# Altium PCB PCB_Interface_Board_7500-0428.PcbDoc (part 3 of 5)
Units mil, origin at the board's own origin, x right, y up, seen from the top; angles counter-clockwise.
Board outline 3850 x 4150 mil, 4 copper layers (Top Layer 1, GND+Signal, PWR+Signal, Bottom Layer 1), stack 62.449 mil thick; 247 components, 137 nets, 1675 pads, 241 vias.
Unrouted connection lines stored in the file: 122.
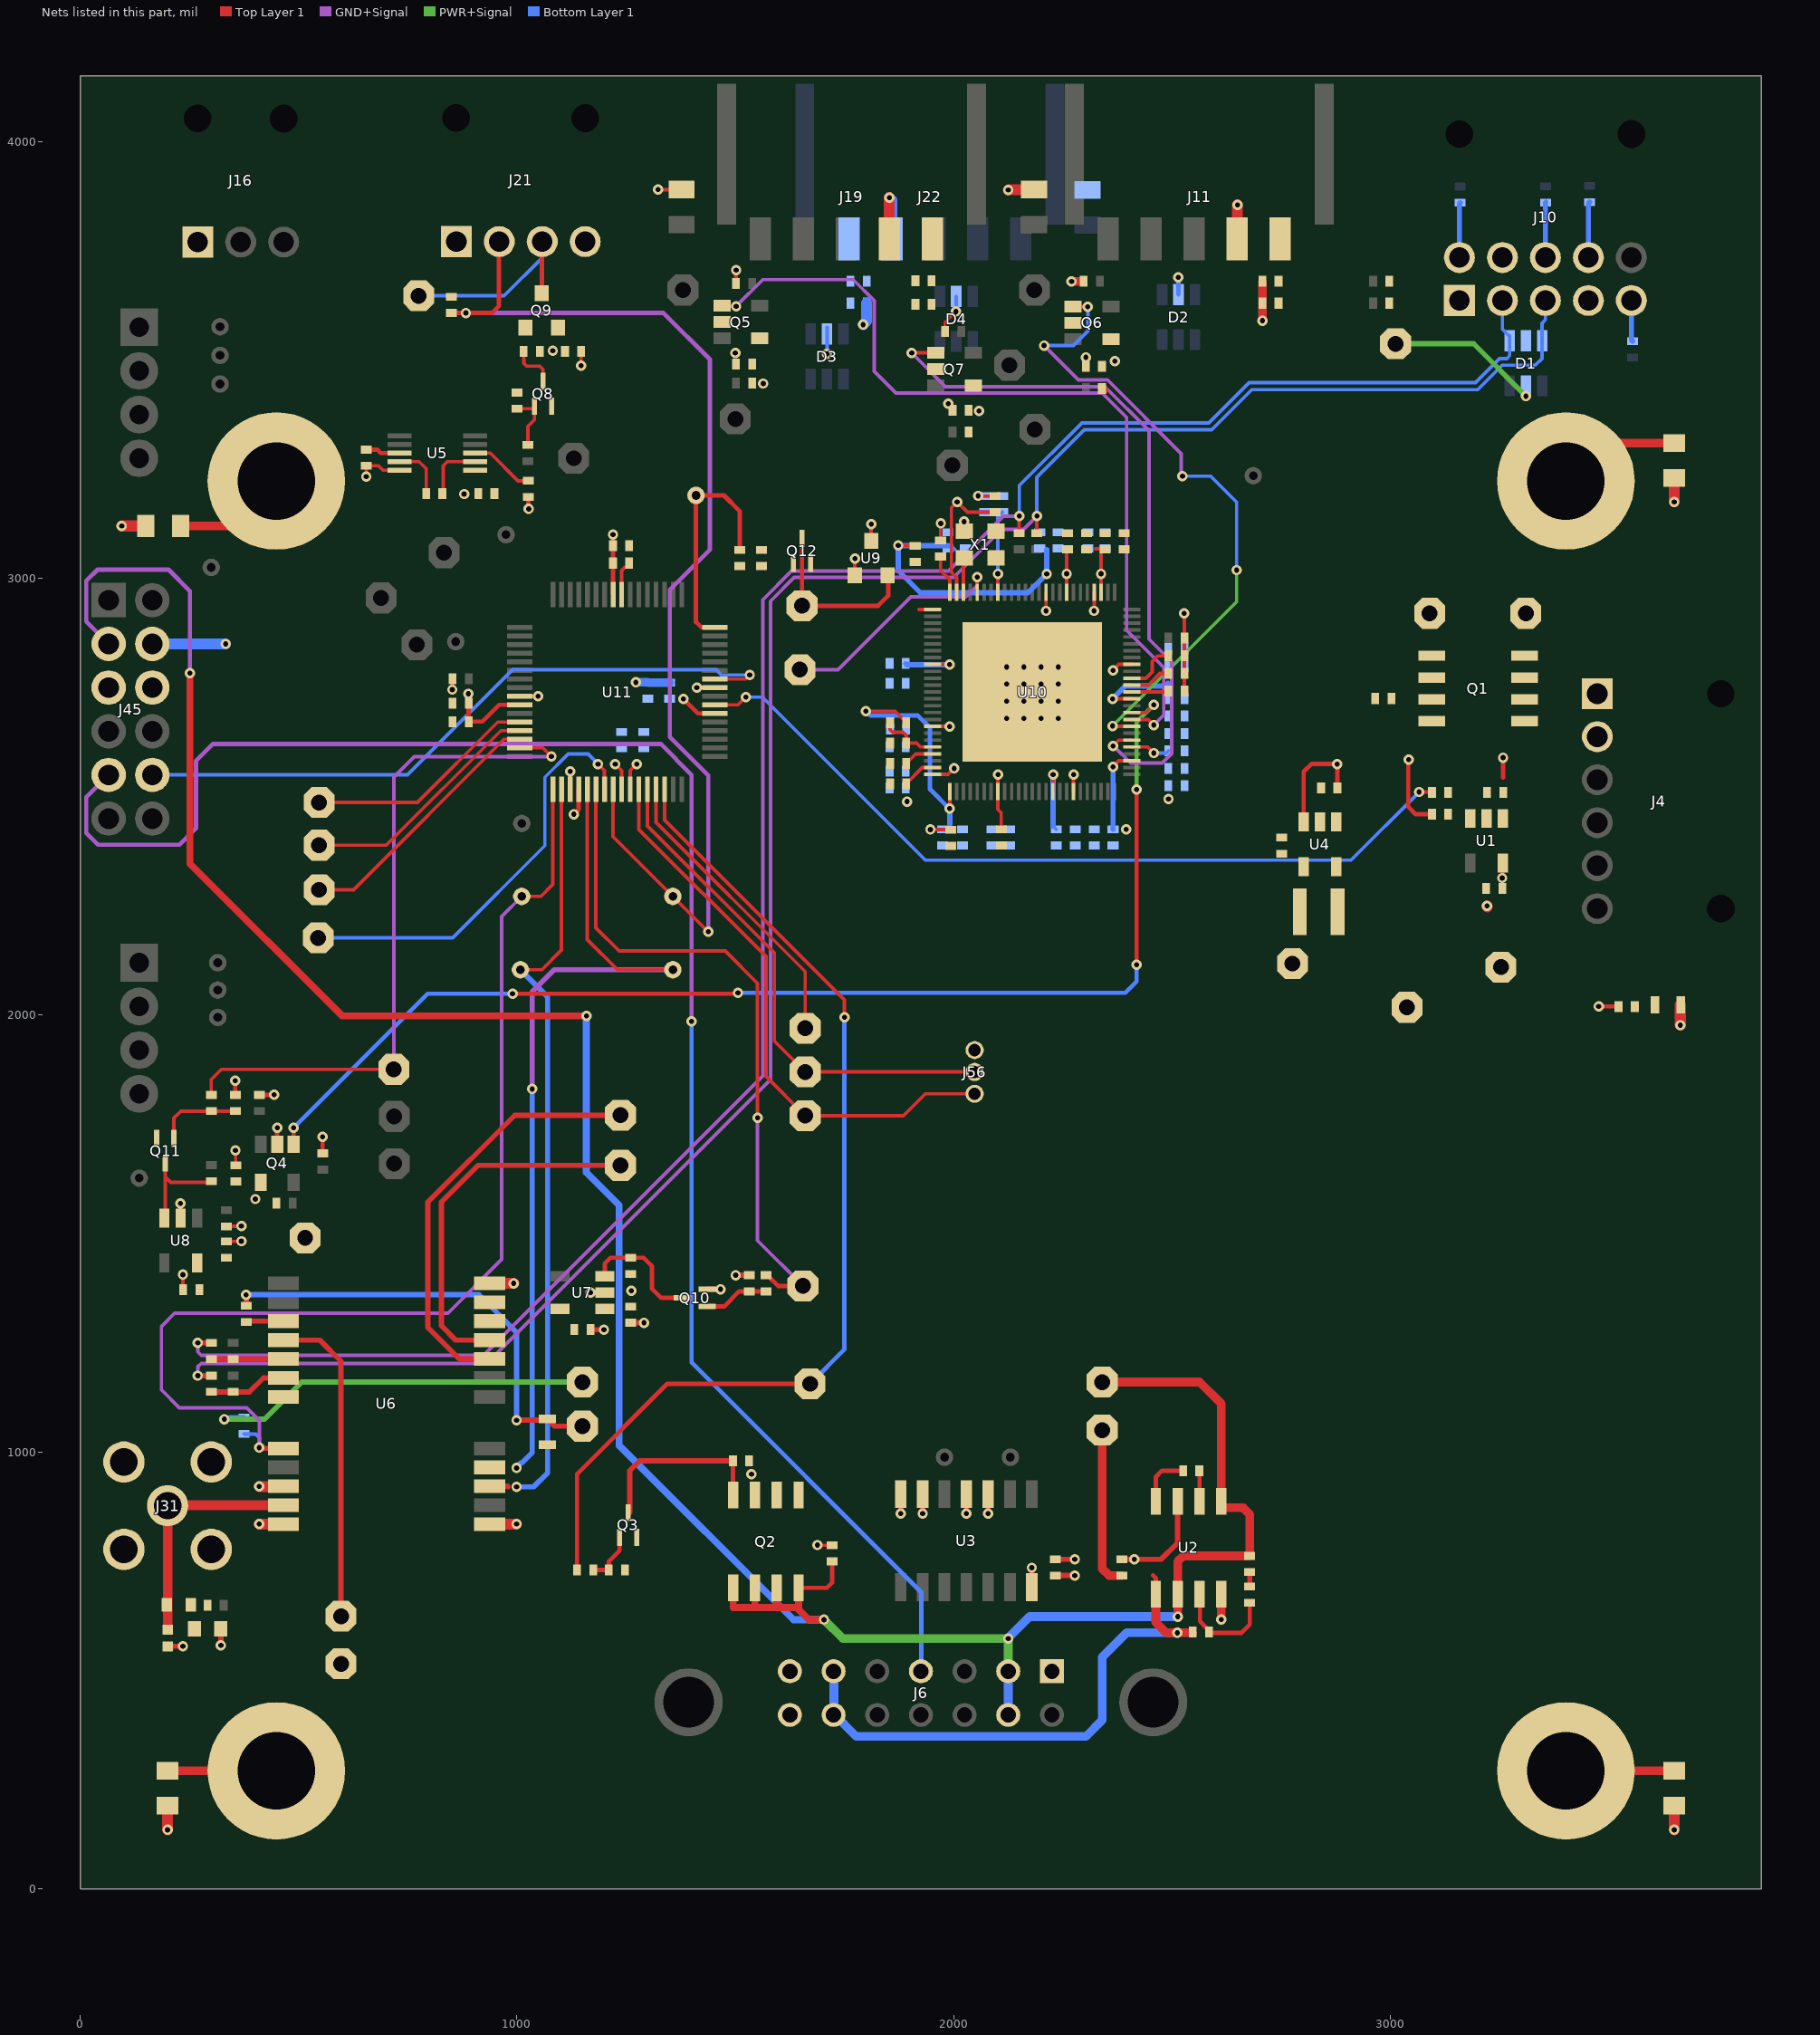
[diagram p4: the nets of this part, all layers, seen from the top]

## Part data (continued)
R44: library part RC0402FR-0712KL, "RES 12K OHM 1% 1/16W 0402", Case Code (Imperial)=0402, Case Code (Metric)=1005, Manufacturer=Yageo, Max Operating Temperature=155°C, Max Power Dissipation=63mW, Min Operating Temperature=-55°C, Package Quantity=1, Power Rating=62.5mW, Resistance Tolerance=1%, Resistor Type="Thick Film", Supplier Part Number=5655139, Temperature Coefficient=100ppm/°C, Voltage Rating=50V, Case/Package=0402, Category="Chip SMD Resistors", ComponentLink1Description=https://datasheet.ciiva.com/46412/1018594-46412831.pdf?src-supplier=Element14, ComponentLink1URL=https://datasheet.ciiva.com/46412/1018594-46412831.pdf?src-supplier=Element14, ComponentLink2Description=https://datasheet.ciiva.com/2453/pyu-r-int-thick-7-2453380.pdf?src-supplier=Digikey, ComponentLink2URL=https://datasheet.ciiva.com/2453/pyu-r-int-thick-7-2453380.pdf?src-supplier=Digikey, ComponentLink3Description=https://datasheet.ciiva.com/2453/pyu-r-int-thick-7-2453381.pdf?src-supplier=Digikey, ComponentLink3URL=https://datasheet.ciiva.com/2453/pyu-r-int-thick-7-2453381.pdf?src-supplier=Digikey, ComponentLink4Description=https://datasheet.ciiva.com/2453/pyu-r-int-thick-7-2453379.pdf?src-supplier=Digikey, ComponentLink4URL=https://datasheet.ciiva.com/2453/pyu-r-int-thick-7-2453379.pdf?src-supplier=Digikey, ComponentLink5Description=https://datasheet.ciiva.com/12577/pyu-rc0402-51-rohs-l-6-r-12577269.pdf?src-supplier=Mouser, ComponentLink5URL=https://datasheet.ciiva.com/12577/pyu-rc0402-51-rohs-l-6-r-12577269.pdf?src-supplier=Mouser, ComponentLink6Description=https://datasheet.ciiva.com/7849/1018594-7849833.pdf?src-supplier=Element14, ComponentLink6URL=https://datasheet.ciiva.com/7849/1018594-7849833.pdf?src-supplier=Element14, ComponentLink7Description=https://datasheet.ciiva.com/7849/1018594-7849832.pdf?src-supplier=Element14, ComponentLink7URL=https://datasheet.ciiva.com/7849/1018594-7849832.pdf?src-supplier=Element14, ComponentLink8Description=https://datasheet.ciiva.com/16744/pyu-rc0402-51-rohs-l-6-r-16744492.pdf?src-supplier=Future+Electronics, ComponentLink8URL=https://datasheet.ciiva.com/16744/pyu-rc0402-51-rohs-l-6-r-16744492.pdf?src-supplier=Future+Electronics, Construction=Rectangular, Depth=0.5mm, Features="Moisture Resistant", Height=0.016inch, Lead Free=5697LeadFree, Length=1mm, Manufacturer Part Number=RC0402FR-0712KL, Military Standard=Not, Number of Terminations=2, Packaging="Tape and Reel", Pricing="10000=0.0011, 100000=0.0011, 300000=0.001, 750000=0.001, 2000000=0.0009 (USD)", Reach SVHC Compliant=No, RoHS=Yes, RoHS Compliant=Yes, Series=RC, Stock=2030000, Supplier="Future Electronics", Termination=SMD/SMT, Tolerance=1%, Voltage Rating (AC)=50V, Weight=2.3E-05oz, Width=0.02inch
R54: library part RC0402JR-07200KL, "Res Thick Film 0402 200K Ohm 5% 1/16W", Case Code (Imperial)=0402, Case Code (Metric)=1005, LCSC Part Number=C137903, Manufacturer=Yageo, Max Operating Temperature=155°C, Max Power Dissipation=63mW, Min Operating Temperature=-55°C, Package Quantity=1, Power Rating=62.5mW, Resistance=200kR, Resistance Tolerance=5%, Resistor Type="Thick Film", Supplier Part Number 1=311-200KJRCT-ND, Temperature Coefficient=100ppm/°C, Voltage Rating=50V, Case/Package=0402, Category="Chip SMD Resistors", ComponentLink1Description=https://datasheet.ciiva.com/2452/pyu-r-int-thick-7-2452740.pdf?src-supplier=Digi-Key, ComponentLink1URL=https://datasheet.ciiva.com/2452/pyu-r-int-thick-7-2452740.pdf?src-supplier=Digi-Key, ComponentLink2Description=https://datasheet.ciiva.com/2452/pyu-r-int-thick-7-2452741.pdf?src-supplier=Digi-Key, ComponentLink2URL=https://datasheet.ciiva.com/2452/pyu-r-int-thick-7-2452741.pdf?src-supplier=Digi-Key, ComponentLink3Description=https://datasheet.ciiva.com/8886/pyu-rc0402-51-rohs-l-6-8886901.pdf?src-supplier=Avnet, ComponentLink3URL=https://datasheet.ciiva.com/8886/pyu-rc0402-51-rohs-l-6-8886901.pdf?src-supplier=Avnet, ComponentLink4Description=https://datasheet.ciiva.com/28393/pyu-rc0402-51-rohs-l-6-28393445.pdf?src-supplier=Avnet+Europe, ComponentLink4URL=https://datasheet.ciiva.com/28393/pyu-rc0402-51-rohs-l-6-28393445.pdf?src-supplier=Avnet+Europe, ComponentLink5Description=https://datasheet.ciiva.com/2452/pyu-r-int-thick-7-2452742.pdf?src-supplier=Digi-Key, ComponentLink5URL=https://datasheet.ciiva.com/2452/pyu-r-int-thick-7-2452742.pdf?src-supplier=Digi-Key, ComponentLink6Description=https://datasheet.ciiva.com/12577/pyu-rc0402-51-rohs-l-6-r-12577561.pdf?src-supplier=Mouser, ComponentLink6URL=https://datasheet.ciiva.com/12577/pyu-rc0402-51-rohs-l-6-r-12577561.pdf?src-supplier=Mouser, ComponentLink7Description=https://datasheet.ciiva.com/7983/1018594-7983562.pdf?src-supplier=Element14, ComponentLink7URL=https://datasheet.ciiva.com/7983/1018594-7983562.pdf?src-supplier=Element14, ComponentLink8Description=https://datasheet.ciiva.com/17485/pyu-rc0402-51-rohs-l-6-r-17485631.pdf?src-supplier=Future+Electronics, ComponentLink8URL=https://datasheet.ciiva.com/17485/pyu-rc0402-51-rohs-l-6-r-17485631.pdf?src-supplier=Future+Electronics, Construction=Rectangular, Contact Plating=Tin,Matte, Depth=0.5mm, Features="Moisture Resistant", Height=0.016inch, Lead Free="Lead Free", Length=1mm, Manufacturer Part Number=RC0402JR-07200KL, Military Standard=Not, Number of Terminations=2, Packaging="Tape and Reel", Pricing 1="1=0.10000, 10=0.01300, 100=0.00540, 1000=0.00244, 2500=0.00212, 5000=0.00175 (USD)", Radiation Hardening=No, REACH SVHC="No SVHC", RoHS=Yes, RoHS Compliant=Yes, Series=RC, Size Code=0402, Stock 1=182081, Supplier 1=Digi-Key, Termination=SMD/SMT, Tolerance=5%, Voltage Rating (DC)=50V, Weight=2.3E-05oz, Width=0.02inch
R58 R59 R60 R61: library part RC0805FR-070RL, "RES 0 OHM JUMPER 1/8W 0805", Case Code (Imperial)=0805, Case Code (Metric)=2012, LCSC Part Number=C100045, Manufacturer=Yageo, Max Operating Temperature=155°C, Max Power Dissipation=125mW, Min Operating Temperature=-55°C, Resistance=0mR, Resistor Type="Thick Film", Tolerance=1%, Case/Package=0805, Category="Chip SMD Resistors", ComponentLink1Description=https://datasheet.ciiva.com/15189/getdatasheetpartid-348154-15189885.pdf?src-supplier=Verical, ComponentLink1URL=https://datasheet.ciiva.com/15189/getdatasheetpartid-348154-15189885.pdf?src-supplier=Verical, ComponentLink2Description=https://datasheet.ciiva.com/17042/rc0805-17042698.pdf?src-supplier=Future+Electronics, ComponentLink2URL=https://datasheet.ciiva.com/17042/rc0805-17042698.pdf?src-supplier=Future+Electronics, Construction=Rectangular, Contact Plating=Tin,Matte, Depth=1.25mm, Features="Moisture Resistant", Item Type=Resistor, Lead Free="Lead Free", Length=2mm, Manufacturer Part Number=RC0805FR-070RL, Military Standard=Not, Number of Terminations=2, Packaging="Tape and Reel", Power Rating=125mW, Pricing 1="5000=0.00281, 10000=0.00277, 20000=0.00269 (USD)", Radiation Hardening=No, RoHS=Yes, RoHS Compliant=Yes, Series=RC, Size Code=0805, Stock 1=85000, Supplier 1=Avnet, Supplier Part Number 1=RC0805FR-070RL
U1 U7 U8: "LDO Regulator Pos 3.3V 0.25A 5-Pin SOT-23 T/R", Case/Package=SOT-23-5, Dropout Voltage=250mV, JLCPCB Part Number=C80670, Manufacturer="Texas Instruments", Max Operating Temperature=125°C, Max Output current=250mA, Max Supply Current=425uA, Max Supply Voltage=5.5V, Min Input Voltage=2.2V, Min Operating Temperature=-40°C, Nominal Output Voltage=3.3V, Nominal Supply Current=12uA, Package Quantity=3000, Power Supply Rejection Ratio (PSRR)=60dB, Quiescent Current=25uA, Supplier Part Number=296-38557-1-ND, Accuracy=2%, Category="Voltage Regulators - Linear", ComponentLink1Description=https://datasheet.ciiva.com/48475/lp5907-48475084.pdf?src-supplier=Avnet, ComponentLink1URL=https://datasheet.ciiva.com/48475/lp5907-48475084.pdf?src-supplier=Avnet, ComponentLink2Description=JLCPCB, ComponentLink2URL=https://jlcpcb.com/partdetail/TexasInstruments-LP5907MFX_3_3NOPB/C80670, Height=1.45mm, Item Type=IC, Lead Free="Lead Free", Length=2.9mm, Manufacturer Part Number=LP5907MFX-3.3/NOPB, Min Supply Voltage=2.2V, Mounting Technology="Surface Mount", Number of Channels=1NUMBER, Number of Outputs=1, Number of Regulators=1, Output Configuration=Positive, Output Current=250mA, Output Type=Fixed, Output Voltage=3.3V, Package=SOT-23-5, Packaging="Tape and Reel", Pins=5, Polarity=Positive, Pricing="1=0.6, 10=0.512, 25=0.478, 100=0.3823, 250=0.35496, 500=0.30034, 1000=0.23209 (USD)", Radiation Hardening=No, Reach SVHC Compliant=No, RoHS=Yes, RoHS Compliant=Yes, Series=-, Stock=22318, Supplier=Digikey, Thickness=1.2mm, Width=1.6mm
U2: "IC REG CHRG PUMP ADJ 200MA 8SOIC", Manufacturer=Maxim, Supplier Part Number=700-MAX889RESA, ComponentLink1Description=https://datasheet.ciiva.com/30477/0900766b81253d0c-30477617.pdf?src-supplier=Rs, ComponentLink1URL=https://datasheet.ciiva.com/30477/0900766b81253d0c-30477617.pdf?src-supplier=Rs, ComponentLink2Description=https://datasheet.ciiva.com/3215/max889-3215733.pdf?src-supplier=Avnet, ComponentLink2URL=https://datasheet.ciiva.com/3215/max889-3215733.pdf?src-supplier=Avnet, ComponentLink3Description=https://datasheet.ciiva.com/4874/max889-4874923.pdf?src-supplier=Mouser, ComponentLink3URL=https://datasheet.ciiva.com/4874/max889-4874923.pdf?src-supplier=Mouser, ComponentLink4Description=https://datasheet.ciiva.com/2028/max889-2028980.pdf?src-supplier=Digikey, ComponentLink4URL=https://datasheet.ciiva.com/2028/max889-2028980.pdf?src-supplier=Digikey, Item Type=IC, Manufacturer Part Number=MAX889RESA+, Pricing="1=6.21, 10=5.28, 50=5.28, 100=4.56, 1000=3.28, 10000=3.11 (USD)", RoHS=Yes, Stock=621, Supplier=Mouser
U3: "MAX3080 Series 115 kbps 5.25 V Full Duplex RS-485/RS-422 Transceiver - SOIC-14", Case/Package=SOIC, Manufacturer=Maxim, Max Operating Temperature=85°C, Max Power Dissipation=800mW, Min Operating Temperature=-40°C, Operating Supply Voltage=5V, Output Current=1uA, Output Voltage=13V, Package=14-SOIC, Package Quantity=2500, Supplier Part Number=MAX3080EESD+TCT-ND, Supply Current=375uA, Category="RS-232 / RS-422 / RS-485 Interface ICs", ComponentLink1Description=https://datasheet.ciiva.com/12260/max3080e-max3089e-99170-12260438.pdf?src-supplier=Mouser, ComponentLink1URL=https://datasheet.ciiva.com/12260/max3080e-max3089e-99170-12260438.pdf?src-supplier=Mouser, ComponentLink2Description=https://datasheet.ciiva.com/14430/max3080e-max3089e-14430038.pdf?src-supplier=Avnet, ComponentLink2URL=https://datasheet.ciiva.com/14430/max3080e-max3089e-14430038.pdf?src-supplier=Avnet, ComponentLink3Description=https://datasheet.ciiva.com/1774/max3080e-max3089e-1774749.pdf?src-supplier=Digikey, ComponentLink3URL=https://datasheet.ciiva.com/1774/max3080e-max3089e-1774749.pdf?src-supplier=Digikey, Data Rate=115Kbps, Item Type=IC, Lead Free="Lead Free", Logic Function=Transceiver, Manufacturer Part Number=MAX3080EESD+T, Mounting Technology="Surface Mount", Number of Drivers=1, Number of Receivers=1, Number of Transmitters=1, Packaging="Tape and Reel", Pricing="1=6.26, 10=5.625, 25=5.3176, 100=4.6086, 250=4.37228, 500=3.92324, 1000=3.30876 (USD)", RoHS=Yes, RoHS Compliant=Yes, Series=MAX3080E, Stock=1816, Supplier=Digikey
U4: "IC REG BUCK 1.2V 600MA SOT23-5", Case/Package=SOT-23-5, LCSC Part Number=C2071166, Manufacturer="TI National Semiconductor", Max Operating Temperature=85°C, Max Output current=600mA, Max Supply Voltage=5.5V, Min Input Voltage=2.7V, Min Operating Temperature=-30°C, Min Output Voltage=1.2V, Package Quantity=3000, Quiescent Current=300uA, Switching Frequency=2MHz, ComponentLink1Description=http://components.arrow.com/part/dataview/56701705S8560073N1317?src-supplier=Arrow+Electronics, ComponentLink1URL=http://components.arrow.com/part/dataview/56701705S8560073N1317?src-supplier=Arrow+Electronics, ComponentLink2Description=http://www.ti.com/general/docs/suppproductinfo.tsp?distId=10&amp;gotoUrl=http%3A%2F%2Fwww.ti.com%2Flit%2Fgpn%2Flm3674&src-supplier=Digikey, ComponentLink2URL=http://www.ti.com/general/docs/suppproductinfo.tsp?distId=10&amp;gotoUrl=http%3A%2F%2Fwww.ti.com%2Flit%2Fgpn%2Flm3674&src-supplier=Digikey, ComponentLink3Description=http://www.ti.com/lit/gpn/lm3674?src-supplier=Mouser, ComponentLink3URL=http://www.ti.com/lit/gpn/lm3674?src-supplier=Mouser, ComponentLink4Description=http://www.ti.com/lit/ds/symlink/lm3674.pdf?src-supplier=Avnet, ComponentLink4URL=http://www.ti.com/lit/ds/symlink/lm3674.pdf?src-supplier=Avnet, ComponentLink5Description=http://www.ti.com/lit/ds/symlink/lm3674.pdf?src-supplier=Digikey, ComponentLink5URL=http://www.ti.com/lit/ds/symlink/lm3674.pdf?src-supplier=Digikey, Item Type=IC, Lead Free="Lead Free", Manufacturer Part Number=LM3674MFX-1.2/NOPB, Mounting Technology="Surface Mount", Number of Outputs=1, Operating Supply Voltage=5.5V, Output Configuration=Positive, Output Current=600mA, Output Type=Fixed, Output Voltage=1.2V, Packaging="Tape and Reel", Pins=5, Pricing="1=1.54, 10=1.38, 50=1.38, 100=1.07, 1000=0.702, 10000=0.599 (USD)", Radiation Hardening=No, RoHS=Yes, RoHS Compliant=Yes, Series=-, Stock=390, Supplier=Mouser, Synchronous Rectifier=Yes
U5: "IC TXRX RS232 460KBPS 10-UMAX", Case/Package=UMAX, JLCPCB Part Number=C1121855, Manufacturer=Maxim, Max Operating Temperature=85°C, Min Operating Temperature=-40°C, Package=MSOP-10, Supplier Part Number=MAX3311EEUB+TCT-ND, Category="RS-232 / RS-422 / RS-485 Interface ICs", ComponentLink1Description=https://datasheet.ciiva.com/14430/max3311e-max3313e-14430143.pdf?src-supplier=Avnet, ComponentLink1URL=https://datasheet.ciiva.com/14430/max3311e-max3313e-14430143.pdf?src-supplier=Avnet, ComponentLink2Description=https://datasheet.ciiva.com/1774/max3311e-max3313e-1774738.pdf?src-supplier=Digikey, ComponentLink2URL=https://datasheet.ciiva.com/1774/max3311e-max3313e-1774738.pdf?src-supplier=Digikey, ComponentLink3Description=JLCPCB, ComponentLink3URL=https://jlcpcb.com/partdetail/1212276-MAX3311EEUBT/C1121855, Data Rate=460Kbps, Item Type=IC, Lead Free="Lead Free", Manufacturer Part Number=MAX3311EEUB+T, Mounting Technology="Surface Mount", Packaging="Cut Tape", Pricing="1=5.92, 10=5.32, 25=5.0292, 100=4.3588, 250=4.13524, 500=3.71054, 1000=3.12937 (USD)", Receiver Hysteresis=500mV, RoHS=Yes, RoHS Compliant=Yes, Series=-, Simplex/Duplex="Full Duplex", Stock=3791, Supplier=Digikey
U6: "Rf Receiver Gnss/gps 1.575GHZ", Case/Package=SMD/SMT, Frequency=1.575GHz, Manufacturer=u-blox, Max Operating Temperature=105°C, Min Operating Temperature=-40°C, Supplier Part Number=672-1174-1-ND, Category="RF Receivers, Transceivers", ComponentLink1Description=https://www.u-blox.com/sites/default/files/NEO-M8Q-01A_DataSheet_%28UBX-15013820%29.pdf?src-supplier=Digikey, ComponentLink1URL=https://www.u-blox.com/sites/default/files/NEO-M8Q-01A_DataSheet_%28UBX-15013820%29.pdf?src-supplier=Digikey, Interface=I2C,SPI,USB,UART, Item Type=Module, Manufacturer Part Number=NEO-M8Q-01A, Mounting Technology="Surface Mount", Pricing="1=25, 10=20.244 (USD)", RoHS=Yes, RoHS Compliant=Yes, Sensitivity=-167dBm, Series=NEO-M8Q-01A, Stock=322, Supplier=Digikey
U9: "IC SUPERVISOR 1 CHANNEL SOT23-3", Case/Package=SOT-23-3, LCSC Part Number=C626154, Manufacturer=Microchip, Max Operating Temperature=125°C, Max Reset Threshold Voltage=3.05V, Max Supply Voltage=5.5V, Min Operating Temperature=-40°C, Min Supply Voltage=1V, Number of Voltages Monitored=1, Operating Supply Current=4.5uA, Supply Current=18uA, Threshold Voltage=2.93V, ComponentLink1Description=https://datasheet.ciiva.com/5838/1441861-5838549.pdf?src-supplier=Farnell, ComponentLink1URL=https://datasheet.ciiva.com/5838/1441861-5838549.pdf?src-supplier=Farnell, ComponentLink2Description=https://datasheet.ciiva.com/12957/mic803-12957068.pdf?src-supplier=Mouser, ComponentLink2URL=https://datasheet.ciiva.com/12957/mic803-12957068.pdf?src-supplier=Mouser, ComponentLink3Description=https://datasheet.ciiva.com/16462/mic803-16462056.pdf?src-supplier=Future+Electronics, ComponentLink3URL=https://datasheet.ciiva.com/16462/mic803-16462056.pdf?src-supplier=Future+Electronics, Item Type=IC, Manufacturer Part Number=MIC803-29D4VM3-TR, Mounting Technology="Surface Mount", Number of Elements=1, Packaging="Tape and Reel", Pins=3, Pricing="1=0.43, 25=0.35, 100=0.33 (USD)", Reach SVHC Compliant=No, Reset="Active Low", Reset Timeout=1.12s, RoHS=Yes, RoHS Compliant=Yes, Series=-, Stock=5352, Supplier=Digikey, Type="Simple Reset/Power-On Reset", Watchdog Timer=No
U10: "IC USB HUB CNTRLR 100VQFN", Case/Package=VQFN, Manufacturer=Microchip, Supplier Part Number=USB7002-I/KDX-ND, ComponentLink1Description=http://ww1.microchip.com/downloads/en/devicedoc/00002445a.pdf?src-supplier=Digikey, ComponentLink1URL=http://ww1.microchip.com/downloads/en/devicedoc/00002445a.pdf?src-supplier=Digikey, Interface=USB, Item Type=IC, Manufacturer Part Number=USB7002-I/KDX, Packaging=Tray, Pricing="1=10.9, 25=9.09, 100=8.775 (USD)", RoHS=Yes, RoHS Compliant=Yes, Series="Automotive, AEC-Q100", Stock=148, Supplier=Digikey
U11: "IC MCU 8BIT 96KB FLASH 64TQFP", Case/Package=TQFP, Clock Frequency=40MHz, Manufacturer=Microchip, Max Operating Temperature=125°C, Max Power Dissipation=1W, Max Supply Voltage=5.5V, Min Operating Temperature=-40°C, Min Supply Voltage=4.2V, Operating Supply Voltage=5V, Package Quantity=1200, Supplier Part Number=PIC18F6627T-E/PT-ND, Access Time=40us, ComponentLink1Description=https://datasheet.ciiva.com/1496/39646c-1496640.pdf?src-supplier=Avnet, ComponentLink1URL=https://datasheet.ciiva.com/1496/39646c-1496640.pdf?src-supplier=Avnet, ComponentLink2Description=https://datasheet.ciiva.com/6650/39646c-6650215.pdf?src-supplier=Digikey, ComponentLink2URL=https://datasheet.ciiva.com/6650/39646c-6650215.pdf?src-supplier=Digikey, Core Architecture=PIC, Data Bus Width=8b, Frequency=40MHz, Interface=I2C,SPI,UART,USART, Item Type=Microcontrollers, Lead Free="Lead Free", Manufacturer Part Number=PIC18F6627T-E/PT, Memory Format=FLASH, Memory Size=96KB, Mounting Technology="Surface Mount", Number of Programmable I/O=54, Number of Timers/Counters=5, Oscillator Type=Internal, Packaging="Tape and Reel", Peripherals="Brown-out Detect/Reset,POR,PWM,WDT,HLVD", Pins=64, Pricing="1200=9.8625 (USD)", Radiation Hardening=No, RAM Size=3936B, RoHS=Yes, RoHS Compliant=Yes, Series="PIC® 18F", Supplier=Digikey, Watchdog Timer=Yes
X1: library part ECS-2033-250-BN, "XTAL OSC XO 25.0000MHZ CMOS SMD", LCSC Part Number=C2441279, Manufacturer="ECS International", ComponentLink1Description=https://datasheet.ciiva.com/865/ecs-2025-2033-865424.pdf?src-supplier=Digikey, ComponentLink1URL=https://datasheet.ciiva.com/865/ecs-2025-2033-865424.pdf?src-supplier=Digikey, ComponentLink2Description=https://datasheet.ciiva.com/865/ecs-2025-2033-865425.pdf?src-supplier=Digikey, ComponentLink2URL=https://datasheet.ciiva.com/865/ecs-2025-2033-865425.pdf?src-supplier=Digikey, ComponentLink3Description=https://datasheet.ciiva.com/865/ecs-2025-2033-865426.pdf?src-supplier=Digikey, ComponentLink3URL=https://datasheet.ciiva.com/865/ecs-2025-2033-865426.pdf?src-supplier=Digikey, Item Type=Oscillators, Manufacturer Part Number=ECS-2033-250-BN, Pricing="1=2.82, 10=2.757, 50=2.626, 100=2.2978, 500=2.2321 (USD)", RoHS=Yes, Stock=33494, Supplier=Digikey

## Free pads (board coordinates)
  round 5 on Mech8: 1(0,4150) 1(3402,270) 1(3402,270) 1(3850,0)
  round 3 on Mech7: 1(10,1773) 1(10,1773) 1(10,2167) 1(10,2167) 1(10,3228) 1(10,3228) 1(10,3622) 1(10,3622) 1(13,2400) 1(13,2400) 1(13,3000) 1(13,3000) 1(163.5,1649.5) 1(163.5,1649.5) 1(163.5,1680.5) 1(163.5,1680.5) 1(168.5,634.25) 1(168.5,634.25) 1(168.5,665.75) 1(168.5,665.75) 1(170,1451) 1(170,1451) 1(170,1519) 1(170,1519) 1(170.31,3096.38) 1(170.31,3143.62) 1(176.38,210.31) 1(176.38,249.69) 1(202,3758) 1(202,3758) 1(202,4179) 1(202,4179) 1(209.69,3096.38) 1(209.69,3143.62) 1(213,2400) 1(213,2400) 1(213,3000) 1(213,3000) 1(219,1279) 1(219,1339) 1(223.62,210.31) 1(223.62,249.69) 1(224,3758) 1(226.5,1649.5) 1(226.5,1649.5) 1(226.5,1680.5) 1(226.5,1680.5) 1(228.5,564.25) 1(228.5,564.25) 1(228.5,595.75) 1(228.5,595.75) 1(231.5,634.25) 1(231.5,634.25) 1(231.5,665.75) 1(231.5,665.75) 1(260,1773) 1(260,1773) 1(260,2167) 1(260,2167) 1(260,3228) 1(260,3228) 1(260,3622) 1(260,3622) 1(282,1100) 1(290,1451) 1(290,1451) 1(290,1519) 1(290,1519) 1(291.5,564.25) 1(291.5,564.25) 1(291.5,595.75) 1(291.5,595.75) 1(310,1279) 1(310,1279) 1(316,3758) 1(318,1100) 1(318,1100) 1(324,3758) 1(325,1415.31) 1(325,1454.69) 1(325,1505.31) 1(325,1544.69) 1(333,1257) 1(336,1118) 1(340,1339) 1(340,1339) 1(345,1415.31) 1(345,1454.69) 1(345,1505.31) 1(345,1544.69) 1(345,1615.31) 1(345,1654.69) 1(358,1322) 1(365,1615.31) 1(365,1654.69) 1(390.94,1633.5) 1(390.94,1633.5) 1(390.94,1696.5) 1(390.94,1696.5) 1(413,3758) 1(422,3758) 1(509.06,1633.5) 1(509.06,1633.5) 1(509.06,1696.5) 1(509.06,1696.5) 1(511,3758) 1(535,1645.31) 1(535,1684.69) 1(535,3758) 1(535,3758) 1(535,4179) 1(535,4179) 1(555,1645.31) 1(555,1684.69) 1(645,3245.31) 1(645,3284.69) 1(665,3245.31) 1(665,3284.69) 1(760,3230) 1(760,3230) 1(760,3350) 1(760,3350) 1(792,3758) 1(792,3758) 1(792,4179) 1(792,4179) 1(800.31,3186) 1(800.31,3206) 1(814,3758) 1(815.31,2645) 1(815.31,2665) 1(818.5,2694.25) 1(818.5,2694.25) 1(818.5,2725.75) 1(818.5,2725.75) 1(839.69,3186) 1(839.69,3206) 1(854.69,2645) 1(854.69,2665) 1(880,3230) 1(880,3230) 1(880,3350) 1(880,3350) 1(881.5,2694.25) 1(881.5,2694.25) 1(881.5,2725.75) 1(881.5,2725.75) 1(906,3758) 1(909.31,3186) 1(909.31,3206) 1(914,3758) 1(948.69,3186) 1(948.69,3206) 1(1000,3592) 1(1000,3592) 1(1000,3648) 1(1000,3648) 1(1003,3758) 1(1012,3758) 1(1028.5,3394.5) 1(1028.5,3394.5) 1(1028.5,3425.5) 1(1028.5,3425.5) 1(1054,1028) 1(1054,1092) 1(1086,1028) 1(1086,1092) 1(1091.5,3394.5) 1(1091.5,3394.5) 1(1091.5,3425.5) 1(1091.5,3425.5) 1(1101,3758) 1(1110.31,3510) 1(1110.31,3530) 1(1111,3758) 1(1116,1305) 1(1116,1305) 1(1116,1425) 1(1116,1425) 1(1120,3592) 1(1120,3592) 1(1120,3648) 1(1120,3648) 1(1130.31,1260) 1(1130.31,1280) 1(1149.69,3510) 1(1149.69,3530) 1(1169.69,1260) 1(1169.69,1280) 1(1184,1305) 1(1184,1305) 1(1184,1425) 1(1184,1425) 1(1193,9) 1(1193,9) 1(1193,423) 1(1193,497) 1(1193,549) 1(1193,549) 1(1200,3758) 1(1223,3758) 1(1223,3758) 1(1223,4179) 1(1223,4179) 1(1223.5,824.5) 1(1223.5,824.5) 1(1223.5,855.5) 1(1223.5,855.5) 1(1228.5,3084.25) 1(1228.5,3084.25) 1(1228.5,3115.75) 1(1228.5,3115.75) 1(1250,1285.31) 1(1250,1324.69) 1(1250.31,3145) 1(1250.31,3165) 1(1270,1285.31) 1(1270,1324.69) 1(1286.5,824.5) 1(1286.5,824.5) 1(1286.5,855.5) 1(1286.5,855.5) 1(1289.69,3145) 1(1289.69,3165) 1(1291.5,3084.25) 1(1291.5,3084.25) 1(1291.5,3115.75) 1(1291.5,3115.75) 1(1384.25,3818.5) 1(1384.25,3818.5) 1(1384.25,3881.5) 1(1384.25,3881.5) 1(1394.5,1328.5) 1(1394.5,1328.5) 1(1394.5,1391.5) 1(1394.5,1391.5) 1(1415.75,3818.5) 1(1415.75,3818.5) 1(1415.75,3881.5) 1(1415.75,3881.5) 1(1425.5,1328.5) 1(1425.5,1328.5) 1(1425.5,1391.5) 1(1425.5,1391.5) 1(1449,3733) 1(1449,3733) 1(1449,4183) 1(1449,4183) 1(1472,712) 1(1472,712) 1(1472,868) 1(1472,868) 1(1483.5,3525.94) 1(1483.5,3525.94) 1(1483.5,3644.06) 1(1483.5,3644.06) 1(1495.31,3670) 1(1495.31,3690) 1(1517,4126) 1(1534.69,3670) 1(1534.69,3690) 1(1535.31,3470) 1(1535.31,3490) 1(1546.5,3525.94) 1(1546.5,3525.94) 1(1546.5,3644.06) 1(1546.5,3644.06) 1(1574.69,3470) 1(1574.69,3490) 1(1628.5,3034.5) 1(1628.5,3034.5) 1(1628.5,3065.5) 1(1628.5,3065.5) 1(1668,712) 1(1668,712) 1(1668,868) 1(1668,868) 1(1691.5,3034.5) 1(1691.5,3034.5) 1(1691.5,3065.5) 1(1691.5,3065.5) 1(1704.25,728.5) 1(1704.25,728.5) 1(1704.25,791.5) 1(1704.25,791.5) 1(1735.75,728.5) 1(1735.75,728.5) 1(1735.75,791.5) 1(1735.75,791.5) 1(1750,3022) 1(1750,3022) 1(1750,3078) 1(1750,3078) 1(1858,712) 1(1858,712) 1(1858,868) 1(1858,868) 1(1870,3022) 1(1870,3022) 1(1870,3078) 1(1870,3078) 1(1925.31,3570) 1(1925.31,3590) 1(1925.31,3620) 1(1925.31,3640) 1(1964.69,3570) 1(1964.69,3590) 1(1964.69,3620) 1(1964.69,3640) 1(1975,2396.31) 1(1975,2435.69) 1(1978.5,3420.94) 1(1978.5,3420.94) 1(1978.5,3539.06) 1(1978.5,3539.06) 1(1990.31,3375) 1(1990.31,3395) 1(1995,2396.31) 1(1995,2435.69) 1(2001,1780) 1(2001,1780) 1(2001,1960) 1(2001,1960) 1(2021,4126) 1(2029.69,3375) 1(2029.69,3395) 1(2041.5,3420.94) 1(2041.5,3420.94) 1(2041.5,3539.06) 1(2041.5,3539.06) 1(2060.31,3150) 1(2060.31,3170) 1(2088,3733) 1(2088,3733) 1(2088,4183) 1(2088,4183) 1(2090,2396.31) 1(2090,2435.69) 1(2095,1780) 1(2095,1780) 1(2095,1960) 1(2095,1960) 1(2099.69,3150) 1(2099.69,3170) 1(2110,2396.31) 1(2110,2435.69) 1(2184.25,3818.5) 1(2184.25,3818.5) 1(2184.25,3881.5) 1(2184.25,3881.5) 1(2194,3114) 1(2200,3120) 1(2200,3120) 1(2200,3150) 1(2202,712) 1(2202,712) 1(2202,868) 1(2202,868) 1(2215.75,3818.5) 1(2215.75,3818.5) 1(2215.75,3881.5) 1(2215.75,3881.5) 1(2235,725.31) 1(2235,764.69) 1(2249,3733) 1(2249,3733) 1(2249,4183) 1(2249,4183) 1(2250,3065.31) 1(2250,3104.69) 1(2255,725.31) 1(2255,764.69) 1(2270,3065.31) 1(2270,3104.69) 1(2283.5,3525.94) 1(2283.5,3525.94) 1(2283.5,3644.06) 1(2283.5,3644.06) 1(2290,3065.31) 1(2290,3104.69) 1(2295.31,3670) 1(2295.31,3690) 1(2310,3065.31) 1(2310,3104.69) 1(2317,4126) 1(2334.69,3670) 1(2334.69,3690) 1(2335,3085.31) 1(2335,3124.69) 1(2335.31,3475) 1(2335.31,3495) 1(2346.5,3525.94) 1(2346.5,3525.94) 1(2346.5,3644.06) 1(2346.5,3644.06) 1(2355,3085.31) 1(2355,3124.69) 1(2369.25,728.5) 1(2369.25,728.5) 1(2369.25,791.5) 1(2369.25,791.5) 1(2374.69,3475) 1(2374.69,3495) 1(2380,3085.31) 1(2380,3124.69) 1(2400,3085.31) 1(2400,3124.69) 1(2400.75,728.5) 1(2400.75,728.5) 1(2400.75,791.5) 1(2400.75,791.5) 1(2438,722) 1(2438,858) 1(2515.31,965) 1(2515.31,985) 1(2554.69,965) 1(2554.69,985) 1(2632,722) 1(2632,778) 1(2632,778) 1(2632,778) 1(2632,802) 1(2632,802) 1(2632,802) 1(2632,858) 1(2657,9) 1(2657,9) 1(2657,423) 1(2657,497) 1(2657,549) 1(2657,549) 1(2714.25,2348.5) 1(2714.25,2348.5) 1(2714.25,2411.5) 1(2714.25,2411.5) 1(2725.31,3620) 1(2725.31,3640) 1(2745.75,2348.5) 1(2745.75,2348.5) 1(2745.75,2411.5) 1(2745.75,2411.5) 1(2764.69,3620) 1(2764.69,3640) 1(2780,2366) 1(2780,2366) 1(2780,2434) 1(2780,2434) 1(2821,4126) 1(2840.31,2500) 1(2840.31,2520) 1(2879.69,2500) 1(2879.69,2520) 1(2888,3733) 1(2888,3733) 1(2888,4183) 1(2888,4183) 1(2900,2366) 1(2900,2366) 1(2900,2434) 1(2900,2434) 1(3092,3668) 1(3092,3668) 1(3092,4187) 1(3092,4187) 1(3114,3668) 1(3122,2652) 1(3122,2652) 1(3122,2848) 1(3122,2848) 1(3160,2366) 1(3160,2366) 1(3160,2434) 1(3160,2434) 1(3206,3668) 1(3214,3668) 1(3215.31,2280) 1(3215.31,2300) 1(3220.31,2500) 1(3220.31,2520) 1(3254.69,2280) 1(3254.69,2300) 1(3259.69,2500) 1(3259.69,2520) 1(3278,2652) 1(3278,2652) 1(3278,2848) 1(3278,2848) 1(3280,2366) 1(3280,2366) 1(3280,2434) 1(3280,2434) 1(3303,3668) 1(3312,3668) 1(3401,3668) 1(3411,3668) 1(3461,2175) 1(3461,2175) 1(3461,2198) 1(3461,2287) 1(3461,2297) 1(3461,2386) 1(3461,2395) 1(3461,2484) 1(3461,2494) 1(3461,2583) 1(3461,2592) 1(3461,2681) 1(3461,2689) 1(3461,2781) 1(3461,2803) 1(3461,2803) 1(3500,3668) 1(3509,3668) 1(3598,3668) 1(3621,3668) 1(3621,3668) 1(3621,4187) 1(3621,4187) 1(3626.38,210.31) 1(3626.38,249.69) 1(3626.38,3250.31) 1(3626.38,3289.69) 1(3673.62,210.31) 1(3673.62,249.69) 1(3673.62,3250.31) 1(3673.62,3289.69) 1(3882,2175) 1(3882,2175) 1(3882,2803) 1(3882,2803)
  round 3.94 on Mech7: 1(62.2,827.76) 1(62.2,922.24) 1(152.76,737.2) 1(152.76,1012.8) 1(247.24,737.2) 1(247.24,1012.8) 1(337.8,827.76) 1(337.8,922.24)
  round 2.5 on Mech7: 1(158,560) 1(158,600) 1(182,560) 1(182,600) 1(229.35,1360.98) 1(229.35,1383.02) 1(272.65,1360.98) 1(272.65,1383.02) 1(283.5,631.1) 1(283.5,668.9) 1(288.98,1128.35) 1(288.98,1171.65) 1(288.98,1208.35) 1(288.98,1251.65) 1(288.98,1608.35) 1(288.98,1651.65) 1(288.98,1783.35) 1(288.98,1826.65) 1(311.02,1128.35) 1(311.02,1171.65) 1(311.02,1208.35) 1(311.02,1251.65) 1(311.02,1608.35) 1(311.02,1651.65) 1(311.02,1783.35) 1(311.02,1826.65) 1(338.98,1128.35) 1(338.98,1171.65) 1(338.98,1208.35) 1(338.98,1251.65) 1(343.98,1783.35) 1(343.98,1826.65) 1(346.5,631.1) 1(346.5,668.9) 1(361.02,1128.35) 1(361.02,1171.65) 1(361.02,1208.35) 1(361.02,1251.65) 1(366.02,1783.35) 1(366.02,1826.65) 1(368.98,1288.35) 1(368.98,1331.65) 1(374.98,1038.35) 1(374.98,1081.65) 1(391.02,1288.35) 1(391.02,1331.65) 1(397.02,1038.35) 1(397.02,1081.65) 1(398.98,1783.35) 1(398.98,1826.65) 1(421.02,1783.35) 1(421.02,1826.65) 1(452.35,1558.98) 1(452.35,1581.02) 1(495.65,1558.98) 1(495.65,1581.02) 1(838.98,3598.35) 1(838.98,3641.65) 1(848.35,2758.98) 1(848.35,2781.02) 1(861.02,3598.35) 1(861.02,3641.65) 1(891.65,2758.98) 1(891.65,2781.02) 1(948.98,3388.35) 1(948.98,3431.65) 1(971.02,3388.35) 1(971.02,3431.65) 1(1013.98,3268.35) 1(1013.98,3311.65) 1(1014.98,3189.35) 1(1014.98,3232.65) 1(1018.35,3508.98) 1(1018.35,3531.02) 1(1030,2540) 1(1030,2540) 1(1030,2586) 1(1030,2894) 1(1030,2940) 1(1030,2940) 1(1036.02,3268.35) 1(1036.02,3311.65) 1(1037.02,3189.35) 1(1037.02,3232.65) 1(1061.65,3508.98) 1(1061.65,3531.02) 1(1076,2540) 1(1076,2940) 1(1128.35,718.98) 1(1128.35,741.02) 1(1171.65,718.98) 1(1171.65,741.02) 1(1195,-200) 1(1195,-200) 1(1195,0) 1(1213.35,718.98) 1(1213.35,741.02) 1(1248.98,1398.35) 1(1248.98,1441.65) 1(1256.65,718.98) 1(1256.65,741.02) 1(1271.02,1398.35) 1(1271.02,1441.65) 1(1384,2540) 1(1384,2940) 1(1430,2540) 1(1430,2540) 1(1430,2586) 1(1430,2894) 1(1430,2940) 1(1430,2940) 1(1488.35,968.98) 1(1488.35,991.02) 1(1493.35,3423.98) 1(1493.35,3446.02) 1(1498.98,3028.35) 1(1498.98,3071.65) 1(1508.98,1358.35) 1(1508.98,1401.65) 1(1521.02,3028.35) 1(1521.02,3071.65) 1(1531.02,1358.35) 1(1531.02,1401.65) 1(1531.65,968.98) 1(1531.65,991.02) 1(1536.65,3423.98) 1(1536.65,3446.02) 1(1548.98,3028.35) 1(1548.98,3071.65) 1(1558.98,1358.35) 1(1558.98,1401.65) 1(1571.02,3028.35) 1(1571.02,3071.65) 1(1581.02,1358.35) 1(1581.02,1401.65) 1(1842.35,2649.98) 1(1842.35,2672.02) 1(1843.35,2513.98) 1(1843.35,2536.02) 1(1843.35,2558.98) 1(1843.35,2581.02) 1(1844.35,2604.98) 1(1844.35,2627.02) 1(1885.65,2649.98) 1(1885.65,2672.02) 1(1886.65,2513.98) 1(1886.65,2536.02) 1(1886.65,2558.98) 1(1886.65,2581.02) 1(1887.65,2604.98) 1(1887.65,2627.02) 1(1900.98,3028.35) 1(1900.98,3071.65) 1(1923.02,3028.35) 1(1923.02,3071.65) 1(1928.35,3668.98) 1(1928.35,3691.02) 1(1940,2502) 1(1940,2502) 1(1940,2546) 1(1942,2934) 1(1942,2978) 1(1942,2978) 1(1958.98,3068.35) 1(1958.98,3111.65) 1(1971.65,3668.98) 1(1971.65,3691.02) 1(1981.02,3068.35) 1(1981.02,3111.65) 1(1986,2502) 1(1986,2978) 1(1988.35,3323.98) 1(1988.35,3346.02) 1(2010.79,3040.63) 1(2010.79,3040.63) 1(2010.79,3119.37) 1(2010.79,3119.37) 1(2031.65,3323.98) 1(2031.65,3346.02) 1(2109.21,3040.63) 1(2109.21,3040.63) 1(2109.21,3119.37) 1(2109.21,3119.37) 1(2138.98,3058.35) 1(2138.98,3101.65) 1(2161.02,3058.35) 1(2161.02,3101.65) 1(2178.98,3058.35) 1(2178.98,3101.65) 1(2201.02,3058.35) 1(2201.02,3101.65) 1(2293.35,3423.98) 1(2293.35,3446.02) 1(2336.65,3423.98) 1(2336.65,3446.02) 1(2374,2502) 1(2374,2978) 1(2418,2502) 1(2418,2502) 1(2418,2546) 1(2418,2934) 1(2418,2978) 1(2418,2978) 1(2436.57,711.26) 1(2436.57,711.26) 1(2436.57,868.74) 1(2436.57,868.74) 1(2488.35,2718.98) 1(2488.35,2741.02) 1(2488.35,2763.98) 1(2488.35,2786.02) 1(2488.35,2808.98) 1(2488.35,2831.02) 1(2488.35,2853.98) 1(2488.35,2876.02) 1(2531.65,2718.98) 1(2531.65,2741.02) 1(2531.65,2763.98) 1(2531.65,2786.02) 1(2531.65,2808.98) 1(2531.65,2831.02) 1(2531.65,2853.98) 1(2531.65,2876.02) 1(2538.35,574.98) 1(2538.35,597.02) 1(2581.65,574.98) 1(2581.65,597.02) 1(2633.43,711.26) 1(2633.43,711.26) 1(2633.43,868.74) 1(2633.43,868.74) 1(2655,-200) 1(2655,-200) 1(2655,0) 1(2663.98,668.35) 1(2663.98,711.65) 1(2663.98,738.35) 1(2663.98,781.65) 1(2686.02,668.35) 1(2686.02,711.65) 1(2686.02,738.35) 1(2686.02,781.65) 1(2728.35,3668.98) 1(2728.35,3691.02) 1(2771.65,3668.98) 1(2771.65,3691.02) 1(2963.35,3618.98) 1(2963.35,3641.02) 1(2963.35,3668.98) 1(2963.35,3691.02) 1(2968.35,2713.98) 1(2968.35,2736.02) 1(3006.65,3618.98) 1(3006.65,3641.02) 1(3006.65,3668.98) 1(3006.65,3691.02) 1(3011.65,2713.98) 1(3011.65,2736.02) 1(3098.35,2448.98) 1(3098.35,2471.02) 1(3098.35,2498.98) 1(3098.35,2521.02) 1(3141.65,2448.98) 1(3141.65,2471.02) 1(3141.65,2498.98) 1(3141.65,2521.02) 1(3513.35,2008.98) 1(3513.35,2031.02) 1(3556.65,2008.98) 1(3556.65,2031.02) 1(3609,2004) 1(3609,2004) 1(3609,2036) 1(3609,2036) 1(3671,2004) 1(3671,2004) 1(3671,2036) 1(3671,2036)
  round 5 on Mech7: 1(459.84,795.04) 1(459.84,795.04) 1(459.84,1424.96) 1(459.84,1424.96) 1(940.16,795.04) 1(940.16,795.04) 1(940.16,1424.96) 1(940.16,1424.96) 1(2102.83,3137.56) 1(2112.83,3137.56) 1(2788,2320) 1(2788,2320) 1(2794,2320) 1(2794,2320)
  round 10 on Mech7: 1(2107.83,3137.56)
  round 3 on Mech11: 1(3508,188) 1(3508,272) 1(3518,178) 1(3518,178) 1(3518,282) 1(3518,282) 1(3522,138) 1(3522,188) 1(3522,188) 1(3522,188) 1(3522,188) 1(3522,188) 1(3522,272) 1(3522,272) 1(3522,272) 1(3522,272) 1(3522,272) 1(3522,322) 1(3528,178) 1(3528,178) 1(3528,282) 1(3528,282) 1(3572,372) 1(3612,368) 1(3612,368) 1(3612,378) 1(3612,378) 1(3622,230) 1(3622,372) 1(3622,372) 1(3622,372) 1(3622,372) 1(3622,372) 1(3622,388) 1(3650,188) 1(3650,250) 1(3678,230) 1(3678,372) 1(3678,372) 1(3678,372) 1(3678,372) 1(3678,372) 1(3678,388) 1(3688,368) 1(3688,368) 1(3688,378) 1(3688,378) 1(3728,372)
  round 3 on Mech16: 1(3622,188) 1(3622,188) 1(3622,210) 1(3622,210) 1(3622,210) 1(3622,250) 1(3622,250) 1(3622,250) 1(3622,272) 1(3622,272) 1(3678,188) 1(3678,188) 1(3678,210) 1(3678,210) 1(3678,210) 1(3678,250) 1(3678,250) 1(3678,250) 1(3678,272) 1(3678,272)

## Via types
v1: diameter 23.62, hole 11.81, Top Layer 1 to Bottom Layer 1, tented top, 214 vias
v2: diameter 23.62, hole 11.81, Top Layer 1 to Bottom Layer 1, 27 vias

## Nets (pads, with @x,y where several pads share a name; then routed paths per layer and width w, separated by ;. In a path a pad name is that pad's centre, name@x,y a point inside that pad or via, vN(x,y) a via of type N, cw(c..) or ccw(c..) an arc to the next point about the centre after c; other vN are vias at no path point)
1V2: C7.2 C53.1 C54.1 C55.1 C56.1 C57.1 C58.1 C59.1 C60.1 C61.1 C62.1 C63.1 C64.1 C65.1 C66.1 C67.1 C68.1 C70.1 C72.1 C73.1 J70.1 L1.2 U4.4 U10.9 U10.18 U10.25 U10.33 U10.41 U10.55 U10.78 U10.83 U10.93 | length 1061.7
  Top Layer 1 w8: U10.25@1952,2551.02 1987.02,2551.02 v1(2001,2565) ; U10.18@1952,2661.26 v1@1990.49,2661.26 ; U10.9@1952,2802.99 v1@1990.49,2802.99 ; v1@2101.26,2550.49 U10.33@2101.26,2512 2101,2511.74 2101,2471 2109,2463 C73.1@2109,2425.5 ; U10.93@2101.26,2968 v1(2101.26,3010.45) ; U10.41@2227.24,2512 v1@2227.24,2550.49 ; v1(2258.74,3010.45) U10.83@2258.74,2968 2258.74,3064.24 C68.1@2261,3066.5 ; 2325,3067.5 2337.48,3067.5 v1(2337.48,3010.45) U10.78@2337.48,2968 ; U10.55@2408,2614.02 2444.43,2614.02 v1(2458.34,2600.1)
  Bottom Layer 1 w8: v1(2101.26,3010.45) 2101.26,3140.76 C70.1@2112,3151.5 ; C61.1@2227.76,2432.54 C61.1@2234.79,2425.5 ; v1(2458.34,2600.1) 2486.68,2600.1 C63.1@2491.5,2604.92
  Bottom Layer 1 w12: C53.1@1890.5,2805 1893.02,2802.48 v1(1991,2802.48) ; C61.1@2227.76,2432.54 v1(2227.76,2551)
  other v1: 1893,2489 2101.77,2551 1991,2660.75
3V3: C2.1 C35.1 C36.1 C37.1 C38.1 C39.1 C40.1 C41.1 C42.1 C43.1 C44.1 C45.1 C46.1 C47.1 C48.1 C49.1 C50.1 C51.1 C52.1 J3.1 R43.2 R47.2 R48.2 R49.2 R52.2 R53.2 U1.5 U9.3 U10.26 U10.44 U10.53 U10.62 U10.67 U10.79 U10.86 U10.99 X1.1 X1.4 | length 2367
  Top Layer 1 w8: v1(1799,2696) 1865.5,2696 R53.2@1891.5,2670 ; U9.3@1811,3085.37 v1@1811,3123.86 ; v1@1873.51,3074.61 R43.2@1912,3074.61 ; v1(1946.6,2425) 1992.5,2425 C52.1@1993,2424.5 ; v1@1991.02,2473.51 U10.26@1991.02,2512 ; U10.99@2006.77,2968 2006.77,3002.23 1995,3014 1995,3162 v1(2008,3175) 2031.5,3151.5 C35.1@2095,3151.5 ; v1(2211.5,2925.55) U10.86@2211.5,2968 ; U10.44@2274.49,2512 2274.49,2550.49 v1(2275,2551) ; v1(2321.73,2925.55) U10.79@2321.73,2968 ; v1(2364,2724.25) U10.62@2408,2724.25 ; v1@2365,2569.53 2377.99,2582.52 U10.53@2408,2582.52 ; v1(2365,2789.08) 2365,2790 2377.99,2802.99 U10.67@2408,2802.99 ; R49.2@2528.5,2741.81 R48.2@2528.5,2782.21 R47.2@2528.5,2822.6 R52.2@2528.5,2863 2528.5,2913.5 v1@2530,2915 ; v2(3256,2314) 3257.4,2315.4 U1.5@3257.4,2347.82
  Bottom Layer 1 w8: C51.1@1993.88,3075.12 2003,3066
  Bottom Layer 1 w10: v1(1799,2696) 1809.18,2685.82 1918.18,2685.82 1945.63,2658.37 1945.63,2517.88 v1@1991,2472.51
  Bottom Layer 1 w12: 1991,2437 v1@1991,2472.51 ; C51.1@1993.88,3075.12 v1(1873,3075.12) 1873,3018 1924,2967 2170,2967 v1(2213,3010) 2213,3066 ; v1(2364,2724.25) 2393.06,2753.31 2485,2753.31 2490.5,2758.81 2490.5,2760.35 ; C39.1@2365,2425.5 v1(2365,2568.61)
  other v1: 2395.19,2425.19 1990.51,2473 2492,2494.81 2528,2920 1811.51,3124.37
3V3_EN: R6.1 U11.39 | length 1869
  Top Layer 1 w8: U11.39@1453.23,2710.47 1506.47,2710.47 v1(1524,2728) ; v1(3066,2511) 3094.39,2511 R6.1@3095.39,2510
  Bottom Layer 1 w8: v1(1524,2728) 1562,2728 1935,2355 2910,2355 v1(3066,2511)
5V: C1.1 C3.1 C6.2 C8.1 C10.1 C18.2 C21.1 C23.1 C26.2 C30.1 C69.1 C71.1 C74.1 C75.1 C76.1 C77.1 C78.1 C79.1 J2.1 J45.4 Q1.1 Q1.2 Q1.3 Q2.1 Q2.2 Q2.3 Q4.4 Q5.4 Q6.4 Q7.4 Q9.2 R1.2 R3.2 R4.2 R5.1 R13.1 R15.2 R16.2 R20.1 R21.2 R22.2 R23.2 R29.2 R57.1 U1.1 U3.4 U3.14 U4.1 U4.3 U5.1 U7.1 U11.10 U11.19 U11.26 U11.38 U11.57 | length 1451.4
  Top Layer 1 w8: U11.19@1121.73,2516.77 v1@1121.73,2557.05 ; U11.26@1259.53,2516.77 1259.53,2560.16 v1(1274.37,2575)
  Top Layer 1 w10: R15.2@410,1817.4 443.4,1817.4 v1(444,1818) ; v1(852,2745.31) 852,2741 852.5,2741.5 R57.1@852.5,2770 ; v1@889.5,2740.5 C79.1@889.5,2714 C78.1@889.5,2672 921,2672 959.47,2710.47 U11.10@1006.77,2710.47 ; R20.1@1026,3186.4 1026,3160 v1(1027,3159) ; C71.1@1220,3075 v1(1220,3100) ; U11.57@1220.16,2963.23 C71.1@1220.16,3075 ; v1(1381,2724) 1414.21,2690.79 U11.38@1453.23,2690.79 ; v1@2056,3386 2056,3385 v1(2058,3383) ; U4.3@2801.6,2442.18 2801.6,2557.6 2819,2575 v1(2878,2575) 2878.5,2574.5 C6.2@2878.5,2520 ; v1(3042,2585) 3041,2584 3041,2477 3058,2460 R5.1@3095.39,2460 ; 3258,2544 v1(3258,2589.6) ; v1(3477,2020) R3.2@3522.6,2020
  Top Layer 1 w12: v1(2029,859) U3.4@2029,903.3 ; U3.14@2179,690.7 v1(2179,735) ; C3.1@2233,717.21 v1(2277.3,717.21)
  Top Layer 1 w20: v2(1082,3521) v2@1082,3522 ; R21.2@2339.6,3435 R21.2@2343.6,3431
  Bottom Layer 1 w25: J45.4@165,2850 v2(333,2850)
  other v1: 1537,949 1262,1369 401,1579 1121.73,2558.08 889,2736 879,3193 1564,3446 2368.83,3497.44
5V_MB: C5.2 J5.1 J6.3 J6.4 J45.3 Q2.5 Q2.6 Q2.7 Q2.8 R2.2 U2.1 U2.6 | length 6366.2
  Top Layer 1 w10: Q2.8@1645,688.7 1645.24,688.94 1710,688.94 1722,700.94 C5.2@1722,749.5 ; U2.1@2613,887.3 2613,869.58 U2.1@2615.56,872.14 ; R2.2@2676.87,759.14 R2.2@2678,759.27
  Top Layer 1 w12: U2.6@2512,673.7 U2.6@2513,674.7 ; R2.2@2678,759.27 R2.2@2678,762.01
  Top Layer 1 w16: v1@251,2785 v1(251,2783) 251,2347 600,1998 v1(1159,1998) ; Q2.5@1495,688.7 1495,643.94 1545,643.94 ; Q2.6@1545,688.7 1545,643.94 ; Q2.8@1645,688.7 1645,643.94 1640,643.94 ; v1(1703,616) 1667.94,616 1640,643.94 ; 1545,643.94 1595,643.94 ; 1595,643.94 1596,643.94 ; 1595,643.94 Q2.7@1595,688.7 1596,688.7 1596,643.94 ; 1596,643.94 1640,643.94
  Top Layer 1 w20: J5.1@2340,1160 2563,1160 2613,1110 U2.1@2613,887.3 ; v1(2513,623) U2.6@2513,673.7 ; U2.6@2513,674.7 2513,749.14 2525.87,762.01 R2.2@2678,762.01 2678,857.14 2663,872.14 U2.1@2615.56,872.14
  GND+Signal w10: J45.3@65,2850 13.63,2901.37 13.63,2994.34 39.29,3020 202,3020 251,2971 v1(251,2783) v1@251,2782
  PWR+Signal w20: v1(1703,616) 1746.06,572.94 v1(2125,572.94) J6.3@2125,500
  Bottom Layer 1 w16: v1(1159,1998) 1159,1640 1234,1565 1234,1014.94 1632.94,616 v1(1703,616) ; v1(2125,572.94) v1@2125,573.94
  Bottom Layer 1 w20: J6.4@2125,400 J6.3@2125,500 ; v1@2125,573.94 2174.06,623 v1(2513,623)
-5V_MB: C4.2 J6.11 J6.12 J73.1 R9.1 U2.5 | length 1662.6
  Top Layer 1 w10: 2456.79,717.21 2463,711 U2.5@2463,674.7
  Top Layer 1 w20: J73.1@2340,1050 2340,733 2355.79,717.21 C4.2@2385,717.21 ; U2.5@2463,674.7 2463,610 2487,586 v2(2512,586) R9.1@2547.6,586
  Bottom Layer 1 w20: J6.11@1726,500 1726,400 1777.06,348.94 2302.94,348.94 2340,386 2340,530 2396,586 v2(2512,586)
ANA_EXT_TEMP: J21.2 J62.1 R27.2 U11.24 | length 2666.4
  Top Layer 1 w8: U11.24@1220.16,2516.77 1220.16,2408.84 J62.1@1357,2272 v1(1438,2191)
  Top Layer 1 w10: R27.2@850,3607.61 v1(883,3607.61) 942.61,3607.61 958.79,3623.79 J21.2@958.79,3771
  GND+Signal w10: v1(883,3607.61) 1335.39,3607.61 1442,3501 1442,3066 1350,2974 1350,2637.2 1438,2549.2 v1(1438,2191)
CLK_25MHZ: U10.98 X1.3 | length 79.6
  Top Layer 1 w8: U10.98@2022.52,2968 2022.52,3045.49 X1.3@2024,3046.98
EXT_TEMP_5V: J21.3 J23.1 Q9.3 | length 474.3
  Top Layer 1 w10: Q9.3@1056.4,3652.74 1057.21,3653.55 J21.3@1057.21,3771
  Bottom Layer 1 w8: J23.1@775,3647 970.55,3647 1057.85,3734.3 J21.3@1057.85,3771
G\N\S\S\_\P\W\R\_\E\N\: J26.1 R33.1 U11.22 | length 1570.7
  Top Layer 1 w8: U11.22@1180.79,2516.77 1180.79,2200.21 1234,2147 1477,2147 1551,2073 v1(1551,1765)
  Top Layer 1 w10: R33.1@1570,1404.61 1573.5,1404.61 1598.11,1380 J26.1@1655,1380
  GND+Signal w8: v1(1551,1765) 1551,1484 J26.1@1655,1380
G\N\S\S\_\R\E\S\: J57.1 R32.1 U6.8 U11.17 | length 2570.9
  Top Layer 1 w8: J57.1@1011,2272 1055,2272 1082.36,2299.36 U11.17@1082.36,2516.77
  Top Layer 1 w12: v1(410,1010) 411.95,1008.05 U6.8@465,1008.05
  GND+Signal w8: v1(410,1010) 410,1072 381,1101 227,1101 186,1142 186,1288 216,1318 842,1318 965,1441 965,2226 J57.1@1011,2272
  Bottom Layer 1 w8: R32.1@374.98,1041.5 375.48,1041 402,1041 410,1033 v1(410,1010)
G\N\S\S\_\V\B\U\S\_\E\N\: J27.1 R34.1 U11.15 | length 1593.1
  Top Layer 1 w8: R34.1@300,1817.4 300,1853 323,1876 J27.1@718,1876 ; U11.15@1006.77,2612.05 1058.95,2612.05 v1(1079,2592)
  GND+Signal w8: J27.1@718,1876 718,2545 765,2592 v1(1079,2592)
GND: C1.2 C2.2 C3.2 C4.1 C5.1 C6.1 C7.1 C8.2 C9.2 C10.2 C11.2 C16.1 C17.1 C18.1 C19.2 C21.2 C22.2 C23.2 C24.2 C25.1 C26.1 C27.1 C28.1 C29.1 C30.2 C31.2 C32.2 C33.2 C34.2 C35.2 C36.2 C37.2 C38.2 C39.2 C40.2 C41.2 C42.2 C43.2 C44.2 C45.2 C46.2 C47.2 C48.2 C49.2 C50.2 C51.2 C52.2 C53.2 C54.2 C55.2 C56.2 C57.2 C58.2 C59.2 C60.2 C61.2 C62.2 C63.2 C64.2 C65.2 C66.2 C67.2 C68.2 C69.2 C70.2 C71.2 C72.2 C73.2 C74.2 C75.2 C76.2 C77.2 C78.2 C79.2 D1.2 D2.2 D3.2 D4.2 D5.1 J4.2 J6.1 J6.13 J6.14 J10.4 J10.7 J11.4 J16.1 J19.4 J21.1 J21.4 J22.4 J31.2 J31.3 J31.4 J31.5 J33.1 J45.5 J45.6 J56.3 J60.1 LED1.2 LED2.2 Q1.4 Q3.2 Q4.2 Q5.2 Q6.2 Q7.2 Q8.2 Q10.2 Q11.2 Q12.2 R4.1 R10.1 R12.2 R17.1 R24.1 R26.1 R27.1 R28.1 R31.1 R35.1 R36.1 R44.2 R46.1 R54.1 R55.1 R56.1 R58.1 R59.1 R60.1 R61.1 U1.2 U2.3 U2.8 U3.3 U3.6 U3.7 U4.2 U5.10 U6.10 U6.12 U6.13 U6.24 U7.2 U8.2 U9.1 U10.101 U11.9 U11.20 U11.25 U11.41 U11.56 X1.2 | length 3124.2
  Top Layer 1 w8: U8.2@230,1535.18 v1@230,1569.18 ; v1(235.04,1406) 235.35,1405.7 235.35,1372.3 C33.2@235.65,1372 ; R31.1@335,1482 v1@369,1482 ; C32.2@335,1516.5 v1@369,1516.5 ; C8.2@356,1656.5 v1@356,1690.5 ; v2(655,3233) C19.2@655,3257.8 655.2,3258 683,3258 693.37,3247.63 U5.10@731.38,3247.63 ; U11.9@1006.77,2730.16 v1@1047.05,2730.16 ; v2(1147,3487) C26.1@1147,3520 ; v1(1225,2575) 1239.84,2560.16 U11.25@1239.84,2516.77 ; U11.56@1239.84,2963.23 1239.84,3017.84 C69.2@1257,3035 ; v2(1323,3890) C25.1@1377,3890 ; v1@1412.95,2749.84 U11.41@1453.23,2749.84 ; v1(1688,787) 1688.5,786.5 C5.1@1722,786.5 ; U9.1@1773.6,3006.63 v1@1773.6,3045.12 ; R44.2@1970,3086.85 v1@1970,3125.34 ; C24.2@1980.5,3565 1980.5,3586.5 v1(2005,3611) ; X1.2@2024,3108 v1(2024,3129.96) ; v1@2056.51,3188.5 C35.2@2095,3188.5 ; U10.101@2099,2789 2059,2789 2057,2787 2104,2740 U10.101@2180,2740 ; C21.2@2300.1,3485 v1@2300.1,3505.4
  Top Layer 1 w10: R36.1@355,1817.4 v1(355,1850) ; Q4.2@451,1704.29 v1(451,1742) ; C9.2@555,1683.5 v1(555,1721.21) ; v1(1130,2460) 1141.42,2471.42 U11.20@1141.42,2516.77 ; C11.2@1501.5,3675 1501.5,3705.5 v1(1502,3706)
  Top Layer 1 w12: D5.1@200,554.91 200.09,555 v1(235,555) ; v1(322,557) C34.2@322,595 ; C31.2@1168.5,1280 v1(1199.31,1280) ; v1(1168.7,1365) U7.2@1201,1365 U7.2@1213,1365 ; C30.2@1260,1295.8 v1(1290.81,1295.8) ; Q10.2@1435.5,1372.5 v1(1466.31,1372.5) ; v1(1501,1404.61) R35.1@1531.81,1404.61 ; v1(1879,859) U3.7@1879,903.3 ; v1(1929,859) U3.6@1929,903.3 ; v1(2079,859) U3.3@2079,903.3 ; C3.2@2233,754.21 v1(2277.3,754.21) ; C4.1@2385,754.21 v1(2414,754.21) 2475.07,754.21 2513,792.14 U2.3@2513,869.58
  Top Layer 1 w20: v2(2270,3680) C22.2@2295,3680 ; v1(2613,616.14) U2.8@2613,674.7 ; v2(2707,3590) R17.1@2707,3680
  Top Layer 1 w25: v2(95,3120) R61.1@150,3120 ; v2(200,135) R58.1@200,190 ; v2(410,834.82) U6.12@465,834.82 ; v2(410,921) 464.57,921 U6.10@465,921.43 ; U6.13@937.44,834.82 v2@999,834.82 ; U6.24@937.44,1386 v2(992.44,1386) ; J19.4@1852.61,3776.95 v2(1852.61,3871.61) ; v2(2125,3889) 2126,3890 C16.1@2184.25,3890 ; J11.4@2649.27,3776.95 2649.27,3854.27 v2(2650,3855) ; v2(3221,2250) 3222,2249 v2@3222,2248 ; v2(3650,135) R59.1@3650,190 ; v2(3650,3175) R60.1@3650,3230 ; v2(3664,1977) LED1.2@3664,2023.47
  Bottom Layer 1 w8: v1@1710,3514.4 D3.2@1710,3574.6 ; v1(2005,3611) 2006,3612 D4.2@2006,3645.57
  Bottom Layer 1 w10: v1(2514,3689) 2515,3688 D2.2@2515,3649.57
  Bottom Layer 1 w20: v2(1272,2762) 1299.5,2762 C74.2@1300,2761.5 C75.2@1350,2761.5
  Bottom Layer 1 w25: v2(1793,3581) 1800.79,3588.79 R28.1@1800.79,3630 ; v2(1852.61,3871.61) 1858.61,3865.62 J22.4@1858.61,3776.95
  other v1: 369,1482.61 369,1517.11 229.39,1569.18 355.39,1690.5 2121.34,2679.14 2160.71,2679.14 2200.08,2679.14 2239.45,2679.14 2121.34,2718.51 2160.71,2718.51 2200.08,2718.51 2239.45,2718.51 1048.08,2730.16 1411.92,2749.84 2121.34,2757.88 2160.71,2757.88 2200.08,2757.88 2239.45,2757.88 2121.34,2797.25 2160.71,2797.25 2200.08,2797.25 2239.45,2797.25 1774.11,3045.63 1970.51,3125.85 2056,3189.01 1987.71,3400 2302.71,3506 1709.6,3514 1500,3516
  other v2: 999.19,834.82
GNSS_ANT: D5.2 J31.1 L2.2 U6.11 | length 552.7
  Top Layer 1 w20: J31.1@200,880 J31.1@201.87,878.13
  Top Layer 1 w22: D5.2@200,593.09 J31.1@200,880 ; J31.1@201.87,878.13 U6.11@465,878.13
GNSS_ANT_DET: J58.1 U6.15 U11.18 | length 1785.3
  Top Layer 1 w8: J58.1@1008,2104 1057,2104 1102.05,2149.05 U11.18@1102.05,2516.77
  Top Layer 1 w12: U6.15@937.44,921.43 978.57,921.43 980,920
  Bottom Layer 1 w12: v1(999.19,920) 1038,920 1070,952 1070,2042 J58.1@1008,2104
GNSS_ANT_OK: J59.1 U6.16 U11.21 | length 2017.8
  Top Layer 1 w8: U11.21@1161.1,2516.77 1161.1,2172.9 1230,2104 J59.1@1357,2104
  GND+Signal w12: v2(1035,1831) 1035,2054 1085,2104 J59.1@1357,2104
  Bottom Layer 1 w12: v1@1000,963.31 1000,966 1009,975 1011.69,975 1035,998.31 v2(1035,1831)
  other v1: 999.19,963.31
GNSS_VCC_3V3: C31.1 J24.1 R32.2 U6.22 U6.23 U7.5 | length 887.6
  PWR+Signal w12: v1(330.02,1074.98) 421.98,1074.98 507.01,1160 J24.1@1150,1160
  Bottom Layer 1 w12: 342.55,1078.5 R32.2@374.98,1078.5
GNSS_VDDUSB_3V3: C33.1 J25.1 R31.2 U6.7 U8.5
H\U\B\_\R\E\S\: J44.1 R45.1 U11.48 | length 541.9
  Top Layer 1 w10: U11.48@1453.23,2887.64 1422.36,2887.64 1410,2900 1410,3110 J44.1@1410,3190 1474,3190 1510,3154 R45.1@1510,3065.35
MB_PWR_EN: J7.1 R8.1 U11.30 | length 2402.5
  Top Layer 1 w8: U11.30@1338.27,2516.77 1338.27,2446.73 1750,2035 v1(1750,1995)
  Top Layer 1 w10: R8.1@1137.6,730 1137.6,949.6 1344,1156 J7.1@1671,1156
  Bottom Layer 1 w10: J7.1@1671,1156 1750,1235 v1(1750,1995)
NetC12_1: C12.1 J10.5 | length 94.7
  Bottom Layer 1 w12: J10.5@3551.85,3636.15 3551.85,3545.95 C12.1@3555,3542.8
NetC13_1: C13.1 J10.6 | length 126.2
  Bottom Layer 1 w12: J10.6@3158.15,3734.58 3158.15,3858.15 C13.1@3160,3860
NetC14_1: C14.1 J10.8 | length 126.3
  Bottom Layer 1 w12: J10.8@3355,3734.58 3355,3859.5 C14.1@3356,3860.5
NetC15_1: C15.1 J10.9 | length 128
  Bottom Layer 1 w12: J10.9@3453.42,3734.58 3453.42,3858.93 C15.1@3456,3861.5
NetC17_2: C17.2 J11.5 R17.2
NetC19_1: C19.1 U5.8 | length 80.6
  Top Layer 1 w10: C19.1@655,3292.8 657.2,3295 680,3295 688,3287 U5.8@731.38,3287
NetC20_1: C20.1 U5.2 | length 142.2
  Top Layer 1 w8: C20.1@829.2,3194 831,3195.8 831,3258 840.31,3267.31 U5.2@904.61,3267.31
NetC20_2: C20.2 U5.9 | length 124.5
  Top Layer 1 w8: U5.9@731.38,3267.32 775.68,3267.32 792.2,3250.8 C20.2@792.2,3194
NetC27_2: C27.2 J19.5 R24.2
NetC29_2: C29.2 J22.5 R28.2
NetC34_1: C34.1 L2.1 R42.2
NetC80_1: C80.1 U2.4 | length 124.1
  Top Layer 1 w10: U2.4@2463,887.3 2463,943 2477.14,957.14 C80.1@2525.5,957.14
NetC80_2: C80.2 U2.2 | length 87.6
  Top Layer 1 w10: U2.2@2563,869.58 U2.2@2563,887.3 C80.2@2563,957.14
NetJ28_1: J28.1 U6.20 | length 981.8
  Top Layer 1 w12: U6.20@937.44,1212.77 868.23,1212.77 796,1285 796,1572 995,1771 J28.1@1237,1771
NetJ29_1: J29.1 LED2.1 R39.2 | length 1038.4
  Top Layer 1 w12: R39.2@380,1334.61 v1(380,1360) ; v1@999,1072.78 v1(999.19,1072.78) 1067.25,1072.78 LED2.1@1069.47,1075 ; LED2.1@1070,1075.53 1086.53,1059 J29.1@1150,1059
  Bottom Layer 1 w12: v1(380,1360) 913,1360 999.19,1273.81 999.19,1074.19 v1@999,1074
NetJ30_1: J30.1 U6.21 | length 851.9
  Top Layer 1 w12: U6.21@937.44,1256.08 859.92,1256.08 827,1289 827,1572 911,1656 J30.1@1237,1656
NetJ32_1: J32.1 U6.4 | length 735.9
  Top Layer 1 w12: U6.4@465,1256.08 548.92,1256.08 597,1208 J32.1@597,624
NetJ34_1: J34.1 Q12.3 R43.1 U9.2 U10.1 | length 439.6
  Top Layer 1 w8: 1920.41,2928.93 1920.46,2928.98 U10.1@1952,2928.98
  Top Layer 1 w10: Q12.3@1652.81,3091.19 J34.1@1652.81,2937.19 1827.19,2937.19 1850,2960 1850,3005.03 U9.2@1848.4,3006.63
NetJ35_1: J35.1 U10.96 | length 539.3
  Top Layer 1 w8: U10.96@2054.01,2968 v1(2054.01,3002.69)
  GND+Signal w8: J35.1@1648,2791 1735,2791 1902,2958 2028,2958 2054.01,2984.01 v1(2054.01,3002.69)
NetJ49_1: J49.1 U11.12 | length 536
  Top Layer 1 w8: J49.1@547,2487 772,2487 956.1,2671.1 U11.12@1006.77,2671.1
NetJ50_1: J50.1 U11.13 | length 568.5
  Top Layer 1 w8: J50.1@547,2389 700.87,2389 963.29,2651.42 U11.13@1006.77,2651.42
NetJ52_1: J52.1 U11.14 | length 602.6